# Altium PCB TabletDesign.PcbDoc (part 2 of 3)
Units mm, origin at the board's own origin, x right, y up, seen from the top; angles counter-clockwise.
Board outline 140 x 100 mm, 2 copper layers (Top Layer, Bottom Layer); 256 components, 248 nets, 1066 pads, 0 vias.
Unrouted connection lines stored in the file: 625.
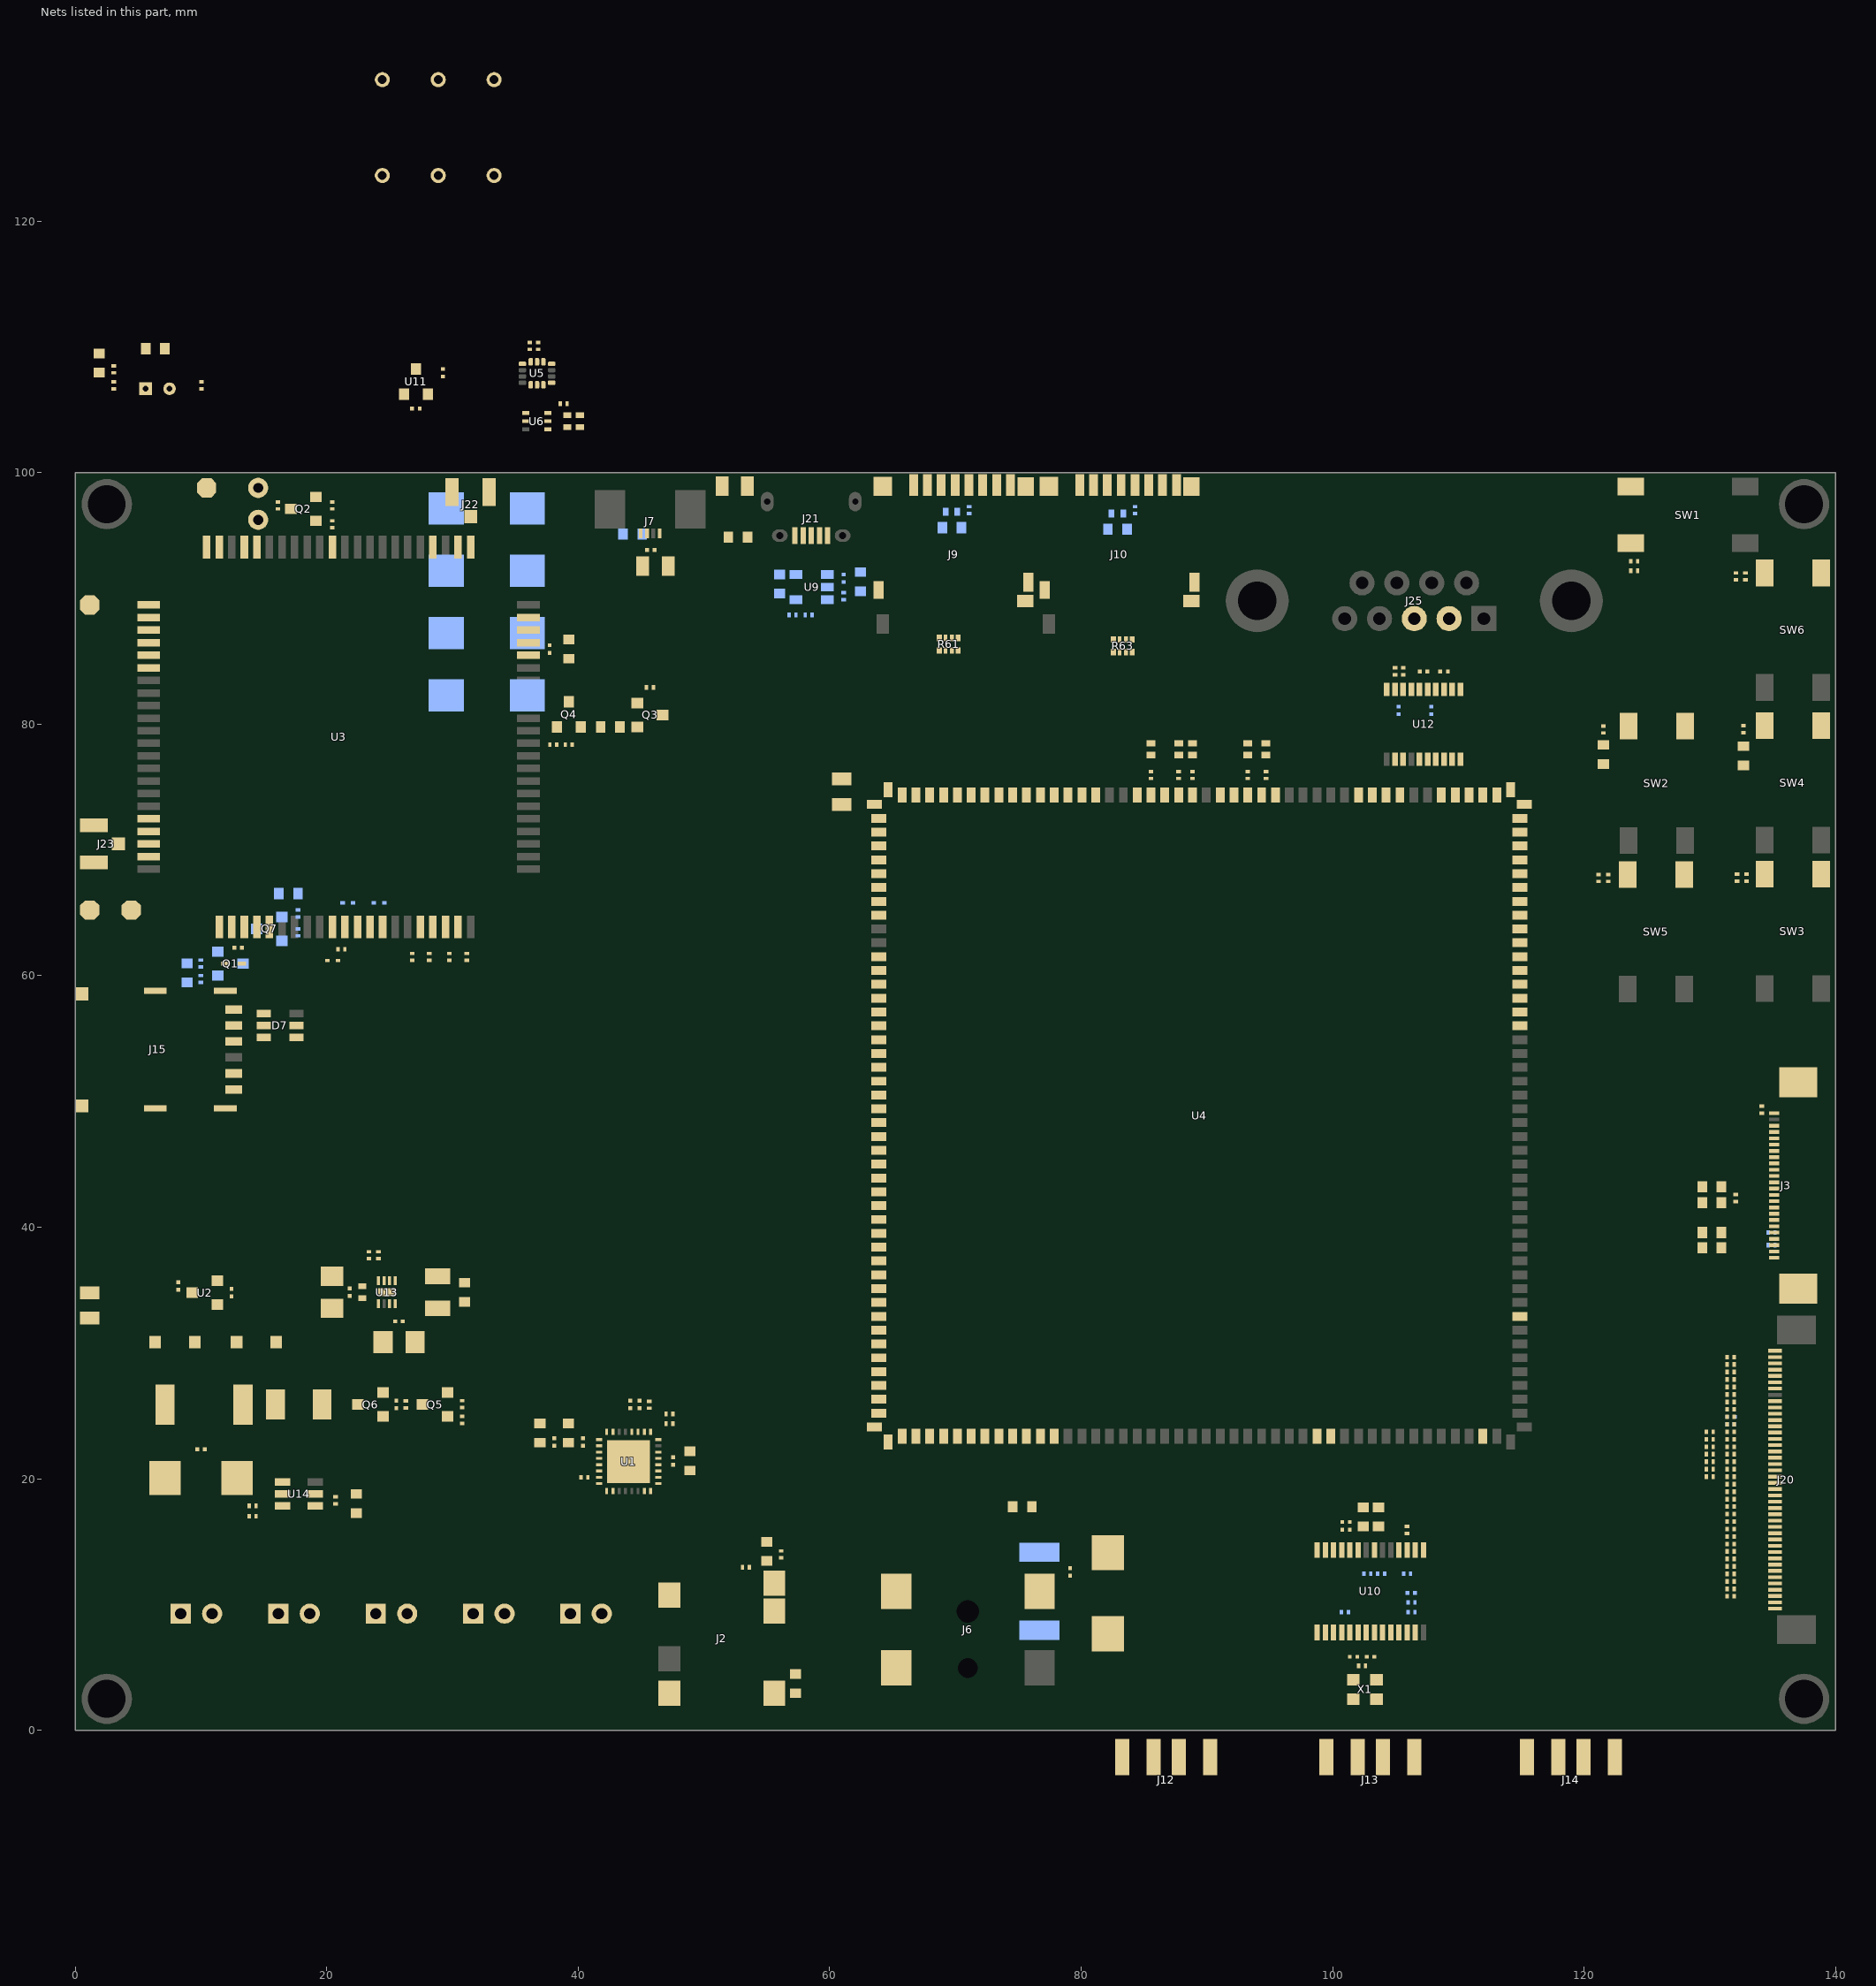
[diagram p2: the nets of this part, all layers, seen from the top]

## Part data (continued)
C38 C39 C54 C56: library part GCM1555C1H101JA16D, "CAP CER 100PF 50V C0G/NP0 0402", Case Code (Imperial)=0402, Case Code (Metric)=1005, Dielectric=C0G, Manufacturer=Murata, Max Operating Temperature=125°C, Min Operating Temperature=-55°C, Package Quantity=10000, Ratings=AEC-Q200, Supplier Part Number 1=490-10669-1-ND, Tolerance=5%, Voltage=50V, Capacitance=100pF, Case/Package=0402, ComponentLink1Description=https://www.verical.com/server-webapp/html/getDatasheet?partID=748988&src-supplier=Verical, ComponentLink1URL=https://www.verical.com/server-webapp/html/getDatasheet?partID=748988&src-supplier=Verical, Depth=0.5mm, Height=0.5mm, Lead Free="Lead Free", Length=1mm, Manufacturer Part Number=GCM1555C1H101JA16D, Mount="Surface Mount", Packaging="Tape and Reel", Pricing 1="1=0.1, 10=0.068, 100=0.0303, 500=0.02166, 1000=0.01701, 2500=0.01547, 5000=0.01423 (USD)", Radiation Hardening=No, REACH SVHC="No SVHC", Stock 1=2688959, Supplier 1=Digi-Key, Termination=SMD/SMT, Thickness=0.022inch, Voltage Rating=50V, Voltage Rating (DC)=50V, Weight=0.000212oz, Width=0.02inch
C65 C66: library part GCM0335C1H180FA16D, "CAP CER 18PF 50V C0G/NP0 0201", Manufacturer=Murata, Supplier Part Number 1=490-GCM0335C1H180FA16DCT-ND, Category="Ceramic Capacitors", Manufacturer Part Number=GCM0335C1H180FA16D, Pricing 1="1=0.10000, 10=0.06500, 50=0.03560, 100=0.02910, 500=0.02076, 1000=0.01630, 2500=0.01482, 5000=0.01364 (USD)", RoHS=Yes, RoHS Compliant=Yes, Stock 1=7977, Supplier 1=Digi-Key
C83: library part GRM0335C1H100FA01D, "CAP CER 10PF 50V C0G/NP0 0201", Case Code (Imperial)=0201, Case Code (Metric)=0603, Dielectric=C0G, Manufacturer=Murata, Max Operating Temperature=125°C, Min Operating Temperature=-55°C, Package Quantity=15000, Supplier Part Number 1=490-7750-1-ND, Tolerance=1%, Voltage Rating=50V, Capacitance=10pF, Case/Package=0201, Category="Ceramic Capacitors", ComponentLink1Description=http://www.mouser.com/ds/2/281/c02e-2905.pdf?src-supplier=Mouser, ComponentLink1URL=http://www.mouser.com/ds/2/281/c02e-2905.pdf?src-supplier=Mouser, ComponentLink2Description=http://search.murata.co.jp/Ceramy/image/img/A01X/G101/ENG/GRM0335C1H100FA01-01.pdf?src-supplier=Digi-Key, ComponentLink2URL=http://search.murata.co.jp/Ceramy/image/img/A01X/G101/ENG/GRM0335C1H100FA01-01.pdf?src-supplier=Digi-Key, Height=0.3mm, Lead Free="Lead Free", Length=0.024inch, Manufacturer Part Number=GRM0335C1H100FA01D, Mount="Surface Mount", Packaging="Tape and Reel", Pricing 1="1=0.10000, 10=0.01900, 50=0.01060, 100=0.00860, 500=0.00616, 1000=0.00484, 2500=0.00440, 5000=0.00405 (USD)", RoHS=Yes, Stock 1=317364, Supplier 1=Digi-Key, Termination=SMD/SMT, Thickness=0.013inch, Voltage Rating (DC)=50V, Width=0.012inch
C84 C87: library part EMK316BBJ476ML-T, "CAP CER 47UF 16V X5R 1206", Case Code (Imperial)=1206, Case Code (Metric)=3216, Manufacturer="Taiyo Yuden", Max Operating Temperature=85°C, Min Operating Temperature=-55°C, Supplier Part Number 1=587-5425-1-ND, Tolerance=20%, Voltage Rating=16V, Capacitance=47uF, Case/Package=1206, ComponentLink1Description=http://ds.yuden.co.jp/TYCOMPAS/ut/detail.do?productNo=EMK316BBJ476ML-T&fileName=EMK316BBJ476ML-T_SS&mode=specSheetDownload&src-supplier=Digi-Key, ComponentLink1URL=http://ds.yuden.co.jp/TYCOMPAS/ut/detail.do?productNo=EMK316BBJ476ML-T&fileName=EMK316BBJ476ML-T_SS&mode=specSheetDownload&src-supplier=Digi-Key, ComponentLink2Description=http://www.farnell.com/datasheets/2819853.pdf?src-supplier=Element14, ComponentLink2URL=http://www.farnell.com/datasheets/2819853.pdf?src-supplier=Element14, ComponentLink3Description=http://www.farnell.com/datasheets/2819853.pdf?src-supplier=Farnell, ComponentLink3URL=http://www.farnell.com/datasheets/2819853.pdf?src-supplier=Farnell, ComponentLink4Description=http://www.farnell.com/datasheets/2819853.pdf?src-supplier=Newark, ComponentLink4URL=http://www.farnell.com/datasheets/2819853.pdf?src-supplier=Newark, Manufacturer Part Number=EMK316BBJ476ML-T, Mount="Surface Mount", Packaging="Tape and Reel", Pricing 1="1=0.81, 10=0.595, 100=0.408, 500=0.32304, 1000=0.27203 (USD)", Stock 1=25339, Supplier 1=Digi-Key
C86: library part CC0402JRNPO9BN220, "CAP CER 22PF 50V C0G/NPO 0402", Case Code (Imperial)=0402, Case Code (Metric)=1005, Dielectric=C0G, Dielectric Material=Ceramic, Insulation Resistance=100GR, Manufacturer=Yageo, Max Operating Temperature=125°C, Min Operating Temperature=-55°C, Package Quantity=1, Supplier Part Number 1=311-1018-1-ND, Temperature Coefficient=30ppm/°C, Tolerance=5%, Voltage=50V, Capacitance=22pF, Case/Package=0402, ComponentLink1Description=http://www.yageo.com/documents/recent/UPY-GP_NP0_16V-to-50V_16.pdf?src-supplier=Digi-Key, ComponentLink1URL=http://www.yageo.com/documents/recent/UPY-GP_NP0_16V-to-50V_16.pdf?src-supplier=Digi-Key, ComponentLink2Description=http://www.farnell.com/datasheets/1443161.pdf?src-supplier=Farnell, ComponentLink2URL=http://www.farnell.com/datasheets/1443161.pdf?src-supplier=Farnell, ComponentLink3Description=http://www.farnell.com/datasheets/1443161.pdf?src-supplier=Element14, ComponentLink3URL=http://www.farnell.com/datasheets/1443161.pdf?src-supplier=Element14, ComponentLink4Description=http://www.yageo.com/documents/recent/UPY-GP_NP0_16V-to-50V_8.pdf?src-supplier=Avnet+Europe, ComponentLink4URL=http://www.yageo.com/documents/recent/UPY-GP_NP0_16V-to-50V_8.pdf?src-supplier=Avnet+Europe, ComponentLink5Description=http://www.farnell.com/datasheets/1132289.pdf?src-supplier=Element14, ComponentLink5URL=http://www.farnell.com/datasheets/1132289.pdf?src-supplier=Element14, ComponentLink6Description=http://www.mouser.com/ds/2/447/Yageo_UPY-GP_NP0_16V-to-50V_9-358835.pdf?src-supplier=Mouser, ComponentLink6URL=http://www.mouser.com/ds/2/447/Yageo_UPY-GP_NP0_16V-to-50V_9-358835.pdf?src-supplier=Mouser, ComponentLink7Description=https://www.verical.com/server-webapp/html/getDatasheet?partID=370074&src-supplier=Verical, ComponentLink7URL=https://www.verical.com/server-webapp/html/getDatasheet?partID=370074&src-supplier=Verical, Composition=Ceramic, Depth=0.5mm, Height=0.5mm, Lead Free="Lead Free", Length=1mm, Manufacturer Part Number=CC0402JRNPO9BN220, Mount="Surface Mount", Number of Pins=2, Packaging="Tape and Reel", Pricing 1="1=0.1, 10=0.029, 100=0.0128, 500=0.00912, 1000=0.00716, 2500=0.00651, 5000=0.00599 (USD)", Radiation Hardening=No, REACH SVHC="No SVHC", Stock 1=518474, Supplier 1=Digi-Key, Termination=SMD/SMT, Thickness=0.022inch, Voltage Rating=50V, Voltage Rating (DC)=50V, Width=0.02inch
C90: library part T491C226K025AT, "CAP TANT 22UF 10% 25V 2312", Case Code (Imperial)=2412, Case Code (Metric)=6032, Case/Package=Molded, Dielectric Material=Tantalum, ESR (Equivalent Series Resistance)=1.4R, Leakage Current=5.5uA, Manufacturer=KEMET, Max Operating Temperature=125°C, Min Operating Temperature=-55°C, Package Quantity=1, Ripple Current=280mA, Supplier Part Number 1=399-3746-1-ND, Tolerance=10%, Voltage=25V, Capacitance=22uF, ComponentLink1Description=https://search.kemet.com/component-edge/download/datasheet/T491C226K025AT.pdf?src-supplier=Digi-Key, ComponentLink1URL=https://search.kemet.com/component-edge/download/datasheet/T491C226K025AT.pdf?src-supplier=Digi-Key, ComponentLink2Description=http://www.jameco.com/Jameco/Products/ProdDS/1573951.pdf?src-supplier=Jameco, ComponentLink2URL=http://www.jameco.com/Jameco/Products/ProdDS/1573951.pdf?src-supplier=Jameco, ComponentLink3Description=https://www.alliedelec.com/m/d/1172a60f7bb3eb66344f86e8fb9ddbde.pdf?src-supplier=Allied+Electronics, ComponentLink3URL=https://www.alliedelec.com/m/d/1172a60f7bb3eb66344f86e8fb9ddbde.pdf?src-supplier=Allied+Electronics, ComponentLink4Description=http://www.farnell.com/datasheets/1698764.pdf?src-supplier=Element14, ComponentLink4URL=http://www.farnell.com/datasheets/1698764.pdf?src-supplier=Element14, ComponentLink5Description=https://api.kemet.com/component-edge/download/datasheet/T491C226K025AT.pdf?src-supplier=Digi-Key, ComponentLink5URL=https://api.kemet.com/component-edge/download/datasheet/T491C226K025AT.pdf?src-supplier=Digi-Key, ComponentLink6Description=http://www.farnell.com/datasheets/1923792.pdf?src-supplier=Element14, ComponentLink6URL=http://www.farnell.com/datasheets/1923792.pdf?src-supplier=Element14, ComponentLink7Description=https://www.distrelec.biz/Web/Downloads/_t/ds/KEM_T2005_T491_eng_tds.pdf?mime=application%2Fpdf&src-supplier=Distrelec, ComponentLink7URL=https://www.distrelec.biz/Web/Downloads/_t/ds/KEM_T2005_T491_eng_tds.pdf?mime=application%2Fpdf&src-supplier=Distrelec, Depth=3.2mm, Dissipation Factor=6%, Features="General Purpose", Height=2.5mm, Height - Seated (Max)=0.11inch, Lead Free="Lead Free", Lead Pitch=2.9mm, Length=6mm, Life (Hours)=2000Hour, Manufacturer Part Number=T491C226K025AT, Mount="Surface Mount,PCB", Number of Pins=2, Packaging="Tape and Reel", Polarity=Polar, Pricing 1="1=0.82, 10=0.626, 100=0.4479 (USD)", Radiation Hardening=No, REACH SVHC="No SVHC", Stock 1=17993, Supplier 1=Digi-Key, Termination=SMD/SMT, Voltage Rating=25V, Voltage Rating (DC)=25V, Width=0.126inch
D1 D2: "DIODE GEN PURP 100V 300MA SOD123", Average Rectified Current=300mA, Capacitance=2pF, Current Rating=150mA, Forward Voltage=1.25V, Manufacturer=Diodes, Max Forward Surge Current (Ifsm)=2A, Max Operating Temperature=150°C, Max Repetitive Reverse Voltage (Vrrm)=100V, Min Operating Temperature=-65°C, Package Quantity=3000, Peak Reverse Current=1uA, Power Dissipation=400mW, Supplier Part Number 1=1N4148W-FDICT-ND, Voltage Rating (DC)=75V, ComponentLink1Description=https://www.diodes.com/assets/Datasheets/ds30086.pdf?src-supplier=Digi-Key, ComponentLink1URL=https://www.diodes.com/assets/Datasheets/ds30086.pdf?src-supplier=Digi-Key, ComponentLink2Description=http://www.farnell.com/datasheets/2238378.pdf?src-supplier=Element14, ComponentLink2URL=http://www.farnell.com/datasheets/2238378.pdf?src-supplier=Element14, ComponentLink3Description=http://www.mouser.com/ds/2/115/ds30086-60872.pdf?src-supplier=Mouser, ComponentLink3URL=http://www.mouser.com/ds/2/115/ds30086-60872.pdf?src-supplier=Mouser, ComponentLink4Description=https://www.diodes.com/assets/Datasheets/ds30086.pdf?src-supplier=Avnet, ComponentLink4URL=https://www.diodes.com/assets/Datasheets/ds30086.pdf?src-supplier=Avnet, ComponentLink5Description=https://www.diodes.com/assets/Datasheets/ds30086.pdf?src-supplier=Avnet+Europe, ComponentLink5URL=https://www.diodes.com/assets/Datasheets/ds30086.pdf?src-supplier=Avnet+Europe, ComponentLink6Description=https://www.diodes.com/assets/Datasheets/ds30086.pdf?src-supplier=Verical, ComponentLink6URL=https://www.diodes.com/assets/Datasheets/ds30086.pdf?src-supplier=Verical, Contact Plating=Tin,Matte, Element Configuration=Single, Forward Current=150mA, Height=1.25mm, Lead Free="Lead Free", Length=2.85mm, Manufacturer Part Number=1N4148W-7-F, Max Reverse Voltage (DC)=100V, Max Surge Current=2A, Mount="Surface Mount", Number of Pins=2, Output Current=150mA, Packaging="Tape and Reel", Peak Non-Repetitive Surge Current=2A, Polarity=Standard, Power Rating=400mW, Pricing 1="1=0.16, 10=0.146, 25=0.1388, 100=0.0611, 250=0.05868, 500=0.048, 1000=0.03333 (USD)", Radiation Hardening=No, REACH SVHC="No SVHC", Recovery Time=4ns, Reverse Recovery Time=4ns, Stock 1=3949286, Supplier 1=Digi-Key, Voltage=100V, Weight=0.000353oz, Width=1.7mm
D3: "TVS DIODE 15V 34V SOD523", Breakdown Voltage=18V, Capacitance=105pF, Clamping Voltage=34V, Clamping Voltage-Max=24V, Leakage Current=500nA, Manufacturer=STMicroelectronics, Max Operating Temperature=150°C, Max Power Dissipation=450W, Min Operating Temperature=-40°C, Package Quantity=1, Peak Pulse Current=12A, Peak Pulse Power=400W, Power Line Protection=No, Resistor Type=Zener, Reverse Standoff Voltage=15V, Supplier Part Number 1=497-10767-1-ND, Category="TVS Diodes", ComponentLink1Description=https://datasheet.ciiva.com/25958/cd00283838-25958148.pdf?src-supplier=Avnet+Europe, ComponentLink1URL=https://datasheet.ciiva.com/25958/cd00283838-25958148.pdf?src-supplier=Avnet+Europe, ComponentLink2Description=https://datasheet.ciiva.com/1276/1303462-1276854.pdf?src-supplier=Element14, ComponentLink2URL=https://datasheet.ciiva.com/1276/1303462-1276854.pdf?src-supplier=Element14, ComponentLink3Description=https://datasheet.ciiva.com/4479/cd00283838-118092-4479548.pdf?src-supplier=Mouser, ComponentLink3URL=https://datasheet.ciiva.com/4479/cd00283838-118092-4479548.pdf?src-supplier=Mouser, ComponentLink4Description=https://datasheet.ciiva.com/5782/cd00283838-5782837.pdf?src-supplier=Farnell, ComponentLink4URL=https://datasheet.ciiva.com/5782/cd00283838-5782837.pdf?src-supplier=Farnell, ComponentLink5Description=https://datasheet.ciiva.com/337/cd00283838-337816.pdf?src-supplier=Digi-Key, ComponentLink5URL=https://datasheet.ciiva.com/337/cd00283838-337816.pdf?src-supplier=Digi-Key, ComponentLink6Description=https://datasheet.ciiva.com/16437/cd00283838-16437848.pdf?src-supplier=Future+Electronics, ComponentLink6URL=https://datasheet.ciiva.com/16437/cd00283838-16437848.pdf?src-supplier=Future+Electronics, ComponentLink7Description=https://datasheet.ciiva.com/337/cd00283838-337817.pdf?src-supplier=Digi-Key, ComponentLink7URL=https://datasheet.ciiva.com/337/cd00283838-337817.pdf?src-supplier=Digi-Key, ComponentLink8Description=https://datasheet.ciiva.com/337/cd00283838-337818.pdf?src-supplier=Digi-Key, ComponentLink8URL=https://datasheet.ciiva.com/337/cd00283838-337818.pdf?src-supplier=Digi-Key, ComponentLink9Description=https://datasheet.ciiva.com/11195/cd00283838-11195357.pdf?src-supplier=Avnet, ComponentLink9URL=https://datasheet.ciiva.com/11195/cd00283838-11195357.pdf?src-supplier=Avnet, ComponentLink10Description=https://datasheet.ciiva.com/15193/getdatasheetpartid-249500-15193085.pdf?src-supplier=Verical, ComponentLink10URL=https://datasheet.ciiva.com/15193/getdatasheetpartid-249500-15193085.pdf?src-supplier=Verical, Contact Plating=Tin,Matte, Depth=0.8mm, Diode Type=ZENER, Direction=Unidirectional, Element Configuration=Single, ESD Protection=Yes, Height=0.5mm, Lead Free="Lead Free", Length=1.2mm, Manufacturer Part Number=ESDA18-1K, Max Breakdown Voltage=18V, Max Reverse Leakage Current=500nA, Min Breakdown Voltage=18V, Mount="Surface Mount", Number of Channels=1, Number of Pins=2, Number of Unidirectional Channels=1, Packaging="Tape and Reel", Polarity=Unidirectional, Pricing 1="1=0.41000, 10=0.28900, 100=0.14570, 500=0.12912, 1000=0.10049 (USD)", Radiation Hardening=No, REACH SVHC="No SVHC", RoHS=Yes, RoHS Compliant=Yes, Series="ESDA, TRANSIL™", Stock 1=43962, Supplier 1=Digi-Key, Termination=SMD/SMT, Width=0.9mm, Working Voltage=15V
D4: "Typical RED GaAs LED", LatestRevisionDate=08-Jul-2005, LatestRevisionNote="Mech Layer 1 removed.", PackageDescription="LED; 2 Leads", PackageReference=LED-1, Published=8-Jun-2000, Publisher="Altium Limited"
D6 D12: "DIODE SCHOTTKY 40V 3A DO214AB", Average Rectified Current=3A, Case/Package=SMC, Forward Voltage=500mV, Manufacturer="Vishay Semiconductors", Max Forward Surge Current (Ifsm)=100A, Max Operating Temperature=125°C, Max Repetitive Reverse Voltage (Vrrm)=40V, Max Reverse Current=500uA, Min Operating Temperature=-55°C, Package Quantity=1, Category="Rectifier Diodes", Contact Plating=Tin,Matte, Current=3A, Current Rating=3A, Element Configuration=Single, Forward Current=3A, Height=2.417mm, Lead Free="Lead Free", Length=7.11mm, Manufacturer Part Number=SS34-E3/57T, Max Reverse Leakage Current=500uA, Max Reverse Voltage (DC)=40V, Max Surge Current=100A, Mount="Surface Mount", Number of Pins=2, Output Current=3A, Packaging="Tape and Reel", Peak Non-Repetitive Surge Current=100A, Polarity=Standard, Pricing 1="850=0.23754, 1700=0.19495, 3400=0.19341, 5100=0.19188, 6800=0.19034, 8500=0.18881, 85000=0.18727 (USD)", Radiation Hardening=No, REACH SVHC=Unknown, RoHS=Yes, Stock 1=850, Supplier 1=Avnet, Supplier Part Number 1=SS34-E3/57T, Voltage=40V, Voltage Rating (DC)=40V, Width=6.22mm
D7: "TVS DIODE 3V SOT23-6", Breakdown Voltage=6.1V, Capacitance=50pF, Case/Package=SOT-23, Clamping Voltage=11.35V, Leakage Current=1uA, Manufacturer=STMicroelectronics, Max Breakdown Voltage=7.2V, Max Operating Temperature=125°C, Max Power Dissipation=100W, Min Operating Temperature=-40°C, Operating Supply Voltage=3V, Package Quantity=1, Peak Pulse Current=15A, Power Line Protection=No, Resistor Type=Zener, Supplier Part Number 1=497-7747-1-ND, Test Current=1mA, Category="TVS Diodes", ComponentLink1Description=https://datasheet.ciiva.com/5782/453742-5782854.pdf?src-supplier=Farnell, ComponentLink1URL=https://datasheet.ciiva.com/5782/453742-5782854.pdf?src-supplier=Farnell, ComponentLink2Description=https://datasheet.ciiva.com/15143/getdatasheetpartid-146092-15143750.pdf?src-supplier=Verical, ComponentLink2URL=https://datasheet.ciiva.com/15143/getdatasheetpartid-146092-15143750.pdf?src-supplier=Verical, ComponentLink3Description=https://datasheet.ciiva.com/16210/cd00005102-16210854.pdf?src-supplier=Future+Electronics, ComponentLink3URL=https://datasheet.ciiva.com/16210/cd00005102-16210854.pdf?src-supplier=Future+Electronics, ComponentLink4Description=https://datasheet.ciiva.com/14161/esda6v1l-st-eng-tds-14161530.pdf?src-supplier=Distrelec, ComponentLink4URL=https://datasheet.ciiva.com/14161/esda6v1l-st-eng-tds-14161530.pdf?src-supplier=Distrelec, ComponentLink5Description=https://datasheet.ciiva.com/4507/cd00005102-58005-4507934.pdf?src-supplier=Mouser, ComponentLink5URL=https://datasheet.ciiva.com/4507/cd00005102-58005-4507934.pdf?src-supplier=Mouser, ComponentLink6Description=https://datasheet.ciiva.com/338/cd00005102-338720.pdf?src-supplier=Digi-Key, ComponentLink6URL=https://datasheet.ciiva.com/338/cd00005102-338720.pdf?src-supplier=Digi-Key, ComponentLink7Description=https://datasheet.ciiva.com/22695/453742-22695670.pdf?src-supplier=Element14, ComponentLink7URL=https://datasheet.ciiva.com/22695/453742-22695670.pdf?src-supplier=Element14, ComponentLink8Description=https://datasheet.ciiva.com/7662/453742-7662123.pdf?src-supplier=Element14, ComponentLink8URL=https://datasheet.ciiva.com/7662/453742-7662123.pdf?src-supplier=Element14, ComponentLink9Description=https://datasheet.ciiva.com/1276/453742-1276863.pdf?src-supplier=Element14, ComponentLink9URL=https://datasheet.ciiva.com/1276/453742-1276863.pdf?src-supplier=Element14, ComponentLink10Description=https://datasheet.ciiva.com/41443/001184254-da-01-en-transil-array-esda6v1-5sc6-sot-23-6-stm-41443467.pdf?src-supplier=Conrad, ComponentLink10URL=https://datasheet.ciiva.com/41443/001184254-da-01-en-transil-array-esda6v1-5sc6-sot-23-6-stm-41443467.pdf?src-supplier=Conrad, Depth=1.75mm, Diode Type=ZENER, Direction=Unidirectional, Element Configuration="Common Anode", ESD Protection=Yes, Height=1.3mm, Lead Free="Lead Free", Length=3.05mm, Manufacturer Part Number=ESDA6V1-5SC6, Max Reverse Leakage Current=1uA, Min Breakdown Voltage=6.1V, Mount="Surface Mount", Number of Channels=5, Number of Elements=5, Number of Pins=6, Number of Unidirectional Channels=5, Packaging="Tape and Reel", Peak Pulse Power=100W, Polarity=Unidirectional, Pricing 1="1=0.46000, 10=0.39400, 100=0.27370, 500=0.21368, 1000=0.17378 (USD)", Radiation Hardening=No, REACH SVHC="No SVHC", Reverse Breakdown Voltage=6.1V, Reverse Standoff Voltage=3V, RoHS=Yes, RoHS Compliant=Yes, Series="ESDA, TRANSIL™", Stock 1=10768, Supplier 1=Digi-Key, Termination=SMD/SMT, Voltage Rating (DC)=6.1V, Width=1.75mm, Working Voltage=3V
D9 D10 D11: "TVS DIODE 5V 9.8V SOD923", Breakdown Voltage=5.4V, Capacitance=0.9pF, Case/Package=SOD-923-2, Clamping Voltage=9.8V, Leakage Current=1uA, Manufacturer="ON Semiconductor", Max Operating Temperature=150°C, Max Surge Current=1A, Min Operating Temperature=-55°C, Operating Supply Voltage=5V, Package Quantity=1, Peak Pulse Power=150mW, Power Line Protection=No, Resistor Type=Zener, Reverse Breakdown Voltage=5.8V, Supplier Part Number 1=ESD9L5.0ST5GOSCT-ND, Test Current=1mA, Category="ESD and Circuit Protection ICs", Clamping Voltage-Max=9.8V, ComponentLink1Description=https://datasheet.ciiva.com/15143/getdatasheetpartid-185186-15143896.pdf?src-supplier=Verical, ComponentLink1URL=https://datasheet.ciiva.com/15143/getdatasheetpartid-185186-15143896.pdf?src-supplier=Verical, ComponentLink2Description=https://datasheet.ciiva.com/4510/esd9l-d-4510647.pdf?src-supplier=Mouser, ComponentLink2URL=https://datasheet.ciiva.com/4510/esd9l-d-4510647.pdf?src-supplier=Mouser, ComponentLink3Description=https://datasheet.ciiva.com/3304/esd9l-d-3304011.pdf?src-supplier=Avnet, ComponentLink3URL=https://datasheet.ciiva.com/3304/esd9l-d-3304011.pdf?src-supplier=Avnet, ComponentLink4Description=https://datasheet.ciiva.com/16437/esd9l-d-16437835.pdf?src-supplier=Future+Electronics, ComponentLink4URL=https://datasheet.ciiva.com/16437/esd9l-d-16437835.pdf?src-supplier=Future+Electronics, ComponentLink5Description=https://datasheet.ciiva.com/339/esd9l-d-339853.pdf?src-supplier=Digi-Key, ComponentLink5URL=https://datasheet.ciiva.com/339/esd9l-d-339853.pdf?src-supplier=Digi-Key, ComponentLink6Description=https://datasheet.ciiva.com/339/esd9l-d-339854.pdf?src-supplier=Digi-Key, ComponentLink6URL=https://datasheet.ciiva.com/339/esd9l-d-339854.pdf?src-supplier=Digi-Key, ComponentLink7Description=https://datasheet.ciiva.com/11195/esd9l-d-11195342.pdf?src-supplier=Avnet, ComponentLink7URL=https://datasheet.ciiva.com/11195/esd9l-d-11195342.pdf?src-supplier=Avnet, ComponentLink8Description=https://datasheet.ciiva.com/25958/esd9l-d-25958446.pdf?src-supplier=Avnet+Europe, ComponentLink8URL=https://datasheet.ciiva.com/25958/esd9l-d-25958446.pdf?src-supplier=Avnet+Europe, ComponentLink9Description=https://datasheet.ciiva.com/339/esd9l-d-339855.pdf?src-supplier=Digi-Key, ComponentLink9URL=https://datasheet.ciiva.com/339/esd9l-d-339855.pdf?src-supplier=Digi-Key, Contact Plating=Tin,Matte, Depth=0.6mm, Diode Type=ZENER, Direction=Unidirectional, Element Configuration=Single, ESD Protection=Yes, Halogen Free="Halogen Free", Height=0.4mm, Lead Free="Lead Free", Length=0.8mm, Manufacturer Part Number=ESD9L5.0ST5G, Max Breakdown Voltage=5.4V, Max Reverse Leakage Current=1uA, Min Breakdown Voltage=5.4V, Number of Channels=1, Number of Elements=1, Number of Lines=1, Number of Pins=2, Number of Unidirectional Channels=1, Packaging="Tape and Reel", Peak Pulse Current=1A, Polarity=Unidirectional, Power Dissipation=150mW, Pricing 1="1=0.37000, 10=0.25600, 100=0.12500, 500=0.10426, 1000=0.07244, 2000=0.06278 (USD)", Radiation Hardening=No, REACH SVHC="No SVHC", Reverse Standoff Voltage=5V, RoHS=Yes, RoHS Compliant=Yes, Series="Automotive, AEC-Q101", Stock 1=558996, Supplier 1=Digi-Key, Termination=SMD/SMT, Width=0.65mm, Working Voltage=5V
J1 J16 J17 J18 J19: "CONN HEADER R/A 2POS 2.5MM", Color=Natural, Contact Resistance=20mR, Current Rating=3A, Housing Color=White, Insulation Resistance=1GR, Manufacturer=JST, Max Operating Temperature=85°C, Max Voltage Rating (AC)=250V, Min Operating Temperature=-25°C, Package Quantity=1000, Supplier Part Number 1=455-2257-ND, Category="Headers and Wire Housings", ComponentLink1Description=https://datasheet.ciiva.com/16208/s2b-xh-alfsn-16208978.pdf?src-supplier=Future+Electronics, ComponentLink1URL=https://datasheet.ciiva.com/16208/s2b-xh-alfsn-16208978.pdf?src-supplier=Future+Electronics, ComponentLink2Description=https://datasheet.ciiva.com/8052/1684882-8052211.pdf?src-supplier=Element14, ComponentLink2URL=https://datasheet.ciiva.com/8052/1684882-8052211.pdf?src-supplier=Element14, ComponentLink3Description=https://datasheet.ciiva.com/11746/0900766b8082f560-11746947.pdf?src-supplier=RSComponents, ComponentLink3URL=https://datasheet.ciiva.com/11746/0900766b8082f560-11746947.pdf?src-supplier=RSComponents, ComponentLink4Description=https://datasheet.ciiva.com/26894/getdatasheetpartid-640270-26894603.pdf?src-supplier=Verical, ComponentLink4URL=https://datasheet.ciiva.com/26894/getdatasheetpartid-640270-26894603.pdf?src-supplier=Verical, ComponentLink5Description=https://datasheet.ciiva.com/26924/getdatasheetpartid-645395-26924076.pdf?src-supplier=Verical, ComponentLink5URL=https://datasheet.ciiva.com/26924/getdatasheetpartid-645395-26924076.pdf?src-supplier=Verical, ComponentLink6Description=https://datasheet.ciiva.com/26894/getdatasheetpartid-441330-26894909.pdf?src-supplier=Verical, ComponentLink6URL=https://datasheet.ciiva.com/26894/getdatasheetpartid-441330-26894909.pdf?src-supplier=Verical, ComponentLink7Description=https://datasheet.ciiva.com/726/exh-726412.pdf?src-supplier=Digi-Key, ComponentLink7URL=https://datasheet.ciiva.com/726/exh-726412.pdf?src-supplier=Digi-Key, ComponentLink8Description=https://datasheet.ciiva.com/20207/523653-20207183.pdf?src-supplier=Rapid+Electronics, ComponentLink8URL=https://datasheet.ciiva.com/20207/523653-20207183.pdf?src-supplier=Rapid+Electronics, Connector Type="Male Pin", Contact Material=Brass, Contact Plating=Tin,Copper,Lead, Depth=11.5mm, Gender=Male, Housing Material=Polyamide, Lead Free="Lead Free", Lead Pitch=2.5mm, Length=7.4mm, Manufacturer Part Number=S2B-XH-A(LF)(SN), Max Current Rating=3A, Max Voltage Rating (DC)=250V, Mount="Through Hole", Number of Contacts=2, Number of Positions=2, Number of Rows=1, Orientation="Right Angle", Packaging=Bulk, Pitch=2.5mm, Pricing 1="1=0.17000, 10=0.16200, 100=0.11260, 500=0.09524, 1000=0.07792, 5000=0.06927, 10000=0.06277 (USD)", REACH SVHC="No SVHC", RoHS=Yes, Stock 1=44898, Supplier 1=Digi-Key, Termination=Press-Fit, Voltage Rating=250V, Voltage Rating (AC)=250V, Wire/Cable Gauge=22AWG
J2: library part SJ-43504-SMT, "CONN JACK 4COND 3.5MM SMD R/A", Body Color=Black, Case/Package=SMD/SMT, Current Rating=1A, Manufacturer=CUI, Supplier Part Number 1=CP-43504SJCT-ND, Body Material=Brass, Category=Connectors, Color=Black, ComponentLink1Description=http://www.cui.com/product/resource/digikeypdf/sj-43504-smt.pdf?src-supplier=Digi-Key, ComponentLink1URL=http://www.cui.com/product/resource/digikeypdf/sj-43504-smt.pdf?src-supplier=Digi-Key, ComponentLink2Description=https://www.cui.com/product/resource/digikeypdf/sj-43504-smt-tr.pdf?src-supplier=Digi-Key, ComponentLink2URL=https://www.cui.com/product/resource/digikeypdf/sj-43504-smt-tr.pdf?src-supplier=Digi-Key, Connector Type=Jack, Contact Plating=Gold, Gender=Female, Lead Free="Lead Free", Manufacturer Part Number=SJ-43504-SMT-TR, Mount="Surface Mount,Board", Number of Conductors=4, Number of Ports=1, Orientation=Horizontal, Packaging="Tape and Reel", Pricing 1="1=1.14000, 10=1.00500, 25=0.94560, 50=0.90620, 100=0.86680, 250=0.78800, 500=0.70920 (USD)", RoHS=Yes, RoHS Compliant=Yes, Series=-, Shielding=Shielded, Stock 1=13818, Supplier 1=Digi-Key, Termination=Solder
J3: "CONN FFC TOP 24POS 0.50MM R/A", Current Rating=500mA, Manufacturer=Molex, Manufacturer Part Number=52435-2471, Max Operating Temperature=85°C, Max Voltage Rating (AC)=50V, Max Voltage Rating (DC)=5.05kV, Min Operating Temperature=-40°C, Package Quantity=1000, Supplier Part Number 1=WM7975CT-ND, Category="FFC / FPC", ComponentLink1Description=https://datasheet.ciiva.com/1484/1629121-1484657.pdf?src-supplier=Newark, ComponentLink1URL=https://datasheet.ciiva.com/1484/1629121-1484657.pdf?src-supplier=Newark, ComponentLink2Description=https://datasheet.ciiva.com/5137/0524352471-ffc-fpc-connectors-170593-5137745.pdf?src-supplier=Mouser, ComponentLink2URL=https://datasheet.ciiva.com/5137/0524352471-ffc-fpc-connectors-170593-5137745.pdf?src-supplier=Mouser, ComponentLink3Description=https://datasheet.ciiva.com/30088/283130524352471-ffc-fpc-nectors-30088679.pdf?src-supplier=Onlinecomponents.com, ComponentLink3URL=https://datasheet.ciiva.com/30088/283130524352471-ffc-fpc-nectors-30088679.pdf?src-supplier=Onlinecomponents.com, ComponentLink4Description=https://datasheet.ciiva.com/3925/128320524352471-ffc-fpc-nectors-3925353.pdf?src-supplier=Arrow+Electronics, ComponentLink4URL=https://datasheet.ciiva.com/3925/128320524352471-ffc-fpc-nectors-3925353.pdf?src-supplier=Arrow+Electronics, ComponentLink5Description=https://datasheet.ciiva.com/16659/0524352471-ffc-fpc-connectors-16659957.pdf?src-supplier=Avnet+Europe, ComponentLink5URL=https://datasheet.ciiva.com/16659/0524352471-ffc-fpc-connectors-16659957.pdf?src-supplier=Avnet+Europe, ComponentLink6Description=https://datasheet.ciiva.com/8038/1597798-8038390.pdf?src-supplier=Element14, ComponentLink6URL=https://datasheet.ciiva.com/8038/1597798-8038390.pdf?src-supplier=Element14, ComponentLink7Description=https://datasheet.ciiva.com/10364/0524352471-ffc-fpc-connectors-10364236.pdf?src-supplier=Avnet, ComponentLink7URL=https://datasheet.ciiva.com/10364/0524352471-ffc-fpc-connectors-10364236.pdf?src-supplier=Avnet, Contact Location=Top, Contact Material=Bronze, Contact Plating=Gold, Depth=4.7mm, Gender=Receptacle, Housing Material=Nylon, Length=18.6mm, Number of Circuits=24, Number of Contacts=24, Number of Positions=24, Number of Rows=1, Orientation="Right Angle", Packaging="Tape and Reel", Pitch=0.5mm, Pricing 1="1=2.22000, 10=1.89200, 100=1.56290 (USD)", Radiation Hardening=No, REACH SVHC=Unknown, RoHS=Yes, Stackable=No, Stock 1=1377, Supplier 1=Digi-Key, Termination=Solder, Voltage Rating=50V
J6: "DC Power Receptacle Jack 2.5A 2.5mm 6.5mm SMD Power Connectors RoHS", Manufacturer="XKB Enterprise", Package=Custom, Manufacturer Part No=DC-005-5A-2.5-SMT
J7: "CONN FFC BOTTOM 4POS 0.50MM R/A", Actuator Color=Brown, Contact Resistance=20mR, Current Rating=500mA, Flammability Rating="UL94 V-0", Housing Color=Natural, Manufacturer=Molex, Manufacturer Part Number=52746-0471, Max Operating Temperature=85°C, Min Operating Temperature=-20°C, Package Quantity=1, Supplier Part Number 1=WM6768CT-ND, Voltage Rating=50V, Actuator Material=Glass,Polyphenylene, Category="FFC / FPC", ComponentLink1Description=https://datasheet.ciiva.com/8038/1597791-8038563.pdf?src-supplier=Element14, ComponentLink1URL=https://datasheet.ciiva.com/8038/1597791-8038563.pdf?src-supplier=Element14, ComponentLink2Description=https://datasheet.ciiva.com/11745/0900766b80dfdcc6-11745365.pdf?src-supplier=RSComponents, ComponentLink2URL=https://datasheet.ciiva.com/11745/0900766b80dfdcc6-11745365.pdf?src-supplier=RSComponents, ComponentLink3Description=https://datasheet.ciiva.com/15176/getdatasheetpartid-367391-15176714.pdf?src-supplier=Verical, ComponentLink3URL=https://datasheet.ciiva.com/15176/getdatasheetpartid-367391-15176714.pdf?src-supplier=Verical, Contact Location=Bottom, Contact Material=Bronze, Contact Plating=Gold, Depth=4.3mm, Gender=Receptacle, Housing Material=Nylon, Length=8.1mm, Mating Cycles=20, Mount="Surface Mount", Number of Contacts=4, Number of Positions=4, Number of Rows=1, Orientation="Right Angle", Packaging="Tape and Reel", Pitch=0.5mm, Pricing 1="1=0.76000, 10=0.64000, 100=0.49810 (USD)", Radiation Hardening=No, REACH SVHC=Unknown, RoHS=Yes, RoHS Compliant=Yes, Series="Easy-On™ 52746", Stock 1=213, Supplier 1=Digi-Key, Termination=Solder, Wire/Cable Type=Straight
J8 J26: library part "SMD PAD"
J9 J10: "CONN MICRO SD CARD PUSH-PULL R/A", Manufacturer="AMPHENOL ICC (COMMERCIAL PRODUCTS)", Supplier Part Number 1=114-00841-68-6-ND, Connector Type=Connector, Contact Plating=Gold, Manufacturer Part Number=114-00841-68, Mount="Surface Mount", Packaging="Tape and Reel", Pricing 1="1=1.32, 10=1.194, 25=1.1208, 50=1.0722, 100=1.0235, 250=0.926, 500=0.8529 (USD)", Stock 1=29968, Supplier 1=Digi-Key
J12 J13 J14: "USB Connectors 4P RECEPTACLE TYPE A", Color=White, Contact Resistance=30mR, Current Rating=1A, Flammability Rating="UL94 V-0", Insulation Resistance=1GR, Manufacturer="Amphenol FCI", Max Operating Temperature=40°C, Min Operating Temperature=0°C, Package Quantity=42, Supplier Part Number 1=70236897, Body Plating=Nickel, Category=Connectors, ComponentLink1Description=https://datasheet.ciiva.com/851/87583-851211.pdf?src-supplier=Digi-Key, ComponentLink1URL=https://datasheet.ciiva.com/851/87583-851211.pdf?src-supplier=Digi-Key, ComponentLink2Description=https://datasheet.ciiva.com/1100/57319-1100818.pdf?src-supplier=Newark, ComponentLink2URL=https://datasheet.ciiva.com/1100/57319-1100818.pdf?src-supplier=Newark, ComponentLink3Description=https://datasheet.ciiva.com/25614/0900766b8118e6e2-25614557.pdf?src-supplier=RSComponents, ComponentLink3URL=https://datasheet.ciiva.com/25614/0900766b8118e6e2-25614557.pdf?src-supplier=RSComponents, ComponentLink4Description=https://datasheet.ciiva.com/4599/gs-12-095-532824-4599287.pdf?src-supplier=Mouser, ComponentLink4URL=https://datasheet.ciiva.com/4599/gs-12-095-532824-4599287.pdf?src-supplier=Mouser, ComponentLink5Description=https://datasheet.ciiva.com/15181/getdatasheetpartid-106468-15181159.pdf?src-supplier=Verical, ComponentLink5URL=https://datasheet.ciiva.com/15181/getdatasheetpartid-106468-15181159.pdf?src-supplier=Verical, ComponentLink6Description=https://datasheet.ciiva.com/3094/87583-3094440.pdf?src-supplier=Avnet, ComponentLink6URL=https://datasheet.ciiva.com/3094/87583-3094440.pdf?src-supplier=Avnet, ComponentLink7Description=https://datasheet.ciiva.com/14619/70236897-14619037.pdf?src-supplier=Allied+Electronics, ComponentLink7URL=https://datasheet.ciiva.com/14619/70236897-14619037.pdf?src-supplier=Allied+Electronics, Connector Type=USB,Receptacle, Contact Material="Copper Alloy", Contact Plating=GXT,Gold, Depth=14mm, Gender=Receptacle, Housing Material=Thermoplastic, Interface=USB, Length=14.5mm, Manufacturer Part Number=87583-2010BLF, Material=Tin, Mating Cycles=1500, Mount="Surface Mount,Horizontal", Number of Contacts=4, Number of Ports=1, Number of Positions=4, Number of Terminals/Pins=4, Orientation="Right Angle", Packaging=Rail/Tube, Plating=Nickel, Radiation Hardening=No, REACH SVHC="No SVHC", RoHS=Yes, RoHS Compliant=Yes, Series=87583, Supplier 1="Allied Electronics", Termination=Solder, USB Standard="USB 2.0"
J15: "CONN SMART CARD PUSH-PULL", Manufacturer="Wurth Electronics", Supplier Part Number 1=732-5954-1-ND, Connector Type=Connector, Contact Material="Copper Alloy", Contact Plating=Gold, Features=Shielded, Lead Free="Lead Free", Manufacturer Part Number=693043020611, Mount="Surface Mount", Number of Contacts=6, Number of Pins=6, Number of Positions=6, Packaging="Tape and Reel", Pricing 1="1=1.69, 10=1.663, 50=1.54, 100=1.417, 500=1.232 (USD)", REACH SVHC=Unknown, Stock 1=21915, Supplier 1=Digi-Key
J20: "CONN FPC BOTTOM 42POS 0.50MM R/A"
J21: "USB - Micro B Female USB 2 5 SMD USB Connectors RoHS", Color=Black, Current Rating=1.8A, Flammability Rating="UL94 V-0", Insulation Resistance=1GR, Manufacturer="Amphenol FCI", Max Operating Temperature=85°C, Max Voltage Rating (AC)=100V, Min Operating Temperature=-55°C, Package Quantity=9600, Supplier Part Number 1=609-4618-1-ND, ComponentLink1Description=http://www.amphenol-icc.com/media/wysiwyg/files/drawing/10118194.pdf?src-supplier=Digi-Key, ComponentLink1URL=http://www.amphenol-icc.com/media/wysiwyg/files/drawing/10118194.pdf?src-supplier=Digi-Key, ComponentLink2Description=https://cdn.amphenol-icc.com/media/wysiwyg/files/drawing/10118194.pdf?src-supplier=Mouser, ComponentLink2URL=https://cdn.amphenol-icc.com/media/wysiwyg/files/drawing/10118194.pdf?src-supplier=Mouser, ComponentLink3Description=https://cdn.amphenol-icc.com/media/wysiwyg/files/drawing/10118194.pdf?src-supplier=Verical, ComponentLink3URL=https://cdn.amphenol-icc.com/media/wysiwyg/files/drawing/10118194.pdf?src-supplier=Verical, Connector Type=USB,Receptacle, Contact Material="Copper Alloy", Contact Plating=Gold, Depth=5mm, Features=Shielded, Gender=Receptacle, Housing Material=Polymer, Lead Free="Lead Free", Length=8.05mm, Manufacturer Part Number=10118194-0001LF, Mount="Surface Mount,Horizontal", Number of Contacts=5, Number of Ports=1, Number of Terminals=5, Orientation="Right Angle", Packaging="Tape and Reel", Pitch=0.65mm, Pricing 1="1=0.43, 10=0.405, 25=0.3648, 50=0.3242, 100=0.3107, 250=0.28368, 500=0.27016 (USD)", Radiation Hardening=No, Stock 1=35943, Supplier 1=Digi-Key, Termination=Solder
J22 J23: "CONN U.FL RCPT STR 50 OHM SMD", Case/Package=SMD/SMT, Manufacturer=Hirose, Package Quantity=10000, Supplier Part Number 1=U.FL-R-SMT-1(80)-CUTT, ComponentLink1Description=https://www.hirose.com/product/en/download_file/key_name/U.FL-R-SMT-1%2880%29/category/Specification%20Sheet/doc_file_id/37638/?file_category_id=9&item_id=03310472280&is_series=&src-supplier=Digi-Key, ComponentLink1URL=https://www.hirose.com/product/en/download_file/key_name/U.FL-R-SMT-1%2880%29/category/Specification%20Sheet/doc_file_id/37638/?file_category_id=9&item_id=03310472280&is_series=&src-supplier=Digi-Key, ComponentLink2Description=http://www.mouser.com/ds/2/185/U.FL_catalog-939761.pdf?src-supplier=Mouser, ComponentLink2URL=http://www.mouser.com/ds/2/185/U.FL_catalog-939761.pdf?src-supplier=Mouser, Lead Free="Lead Free", Manufacturer Part Number=U.FL-R-SMT-1(80), Packaging="Tape and Reel", Pricing 1="1=1.07, 500=0.785, 1500=0.74, 2500=0.72, 5000=0.695 (USD)", Stock 1=1272, Supplier 1="Future Electronics"
J25: "CONN D-SUB RCPT 9POS R/A SOLDER", Color=Black, Current Rating=3A, Flammability Rating="UL94 V-0", Manufacturer=Assmann, Max Operating Temperature=105°C, Min Operating Temperature=-55°C, Supplier Part Number 1=AE10924-ND, Voltage Rating=250V, Category="D-Sub Connectors", ComponentLink1Description=http://www.assmann-wsw.com/fileadmin/datasheets/ASS_4888_CO.pdf?src-supplier=Digi-Key, ComponentLink1URL=http://www.assmann-wsw.com/fileadmin/datasheets/ASS_4888_CO.pdf?src-supplier=Digi-Key, Connector Type=D-Sub,Receptacle,Signal, Contact Material="Copper Alloy", Contact Plating=Gold, Housing Material=PBT, Lead Free="Lead Free", Manufacturer Part Number="A-DF 09 A/KG-T4S", Mount="Through Hole", Number of Pins=9, Number of Positions=9, Number of Rows=2, Packaging=Tray, Pricing 1="1=0.79000, 10=0.74200, 25=0.66800, 50=0.59380, 100=0.56910, 250=0.51964, 500=0.49490, 1000=0.40829, 2500=0.37118 (USD)", RoHS=Yes, Stock 1=19005, Supplier 1=Digi-Key, Termination=Solder
L5: library part LQH32PN1R0NNCL, "FIXED IND 1UH 2.5A 43.2 MOHM SMD", Case Code (Imperial)=1210, Case Code (Metric)=3225, Current Rating=2.5A, DC Resistance (DCR)=43.2mR, Inductance Tolerance=30%, Manufacturer=Murata, Max DC Current=1.75A, Max Operating Temperature=85°C, Min Operating Temperature=-40°C, Package Quantity=2000, Resistor Type=Wirewound, Saturation Current=3A, Self Resonant Frequency=100MHz, Supplier Part Number 1=81-LQH32PN1R0NNCL, Test Frequency=1MHz, Case/Package=1210, Category="Fixed Inductors", ComponentLink1Description=https://datasheet.ciiva.com/8002/1668059-8002720.pdf?src-supplier=Element14, ComponentLink1URL=https://datasheet.ciiva.com/8002/1668059-8002720.pdf?src-supplier=Element14, ComponentLink2Description=https://datasheet.ciiva.com/29691/o05e-29691893.pdf?src-supplier=Digi-Key, ComponentLink2URL=https://datasheet.ciiva.com/29691/o05e-29691893.pdf?src-supplier=Digi-Key, Core Material=Ferrite, Height=2mm, Height - Seated (Max)=0.086inch, Inductance=1uH, Lead Free="Lead Free", Length=0.126inch, Manufacturer Part Number=LQH32PN1R0NNCL, Mount="Surface Mount", Packaging="Tape and Reel", Pricing 1="1=0.48000, 10=0.33500, 50=0.33500, 100=0.28700, 1000=0.20100, 10000=0.19400 (USD)", REACH SVHC="No SVHC", RoHS=Yes, RoHS Compliant=Yes, Series=LQH32PN_NC, Shielding=Shielded, Stock 1=228, Supplier 1=Mouser, Termination=SMD/SMT, Tolerance=30%, Weight=0.000564oz, Width=2.5mm
L6: library part 74437324022, "FIXED IND 2.2UH 3.25A 61 MOHM", Case/Package=Nonstandard, Current Rating=3.25A, DC Resistance (DCR)=61mR, Frequency=49MHz, Inductance Tolerance=20%, Manufacturer="Wurth Electronics", Max Operating Temperature=125°C, Min Operating Temperature=-40°C, Package Quantity=3000, Resistor Type=Wirewound, Saturation Current=6.5A, Supplier Part Number 1=732-3331-1-ND, Test Frequency=100kHz, Category="Fixed Inductors", ComponentLink1Description=https://datasheet.ciiva.com/1052/74437324022-1052161.pdf?src-supplier=Digi-Key, ComponentLink1URL=https://datasheet.ciiva.com/1052/74437324022-1052161.pdf?src-supplier=Digi-Key, ComponentLink2Description=https://datasheet.ciiva.com/4961/74437324022-83042-4961251.pdf?src-supplier=Mouser, ComponentLink2URL=https://datasheet.ciiva.com/4961/74437324022-83042-4961251.pdf?src-supplier=Mouser, ComponentLink3Description=https://datasheet.ciiva.com/7892/1735824-7892719.pdf?src-supplier=Element14, ComponentLink3URL=https://datasheet.ciiva.com/7892/1735824-7892719.pdf?src-supplier=Element14, ComponentLink4Description=https://datasheet.ciiva.com/25608/0900766b810c01e6-25608143.pdf?src-supplier=RSComponents, ComponentLink4URL=https://datasheet.ciiva.com/25608/0900766b810c01e6-25608143.pdf?src-supplier=RSComponents, ComponentLink5Description=https://datasheet.ciiva.com/1052/74437324022-1052162.pdf?src-supplier=Digi-Key, ComponentLink5URL=https://datasheet.ciiva.com/1052/74437324022-1052162.pdf?src-supplier=Digi-Key, ComponentLink6Description=https://datasheet.ciiva.com/1052/74437324022-1052163.pdf?src-supplier=Digi-Key, ComponentLink6URL=https://datasheet.ciiva.com/1052/74437324022-1052163.pdf?src-supplier=Digi-Key, ComponentLink7Description=https://datasheet.ciiva.com/48691/001087560-da-01-ml-we-lhmi-smd-speicherdrossel-744373-de-en-48691628.pdf?src-supplier=Conrad, ComponentLink7URL=https://datasheet.ciiva.com/48691/001087560-da-01-ml-we-lhmi-smd-speicherdrossel-744373-de-en-48691628.pdf?src-supplier=Conrad, Core Material=Ferrite,Composite, Depth=4.06mm, Height=1.8mm, Height - Seated (Max)=0.079inch, Inductance=2.2uH, Length=4.45mm, Manufacturer Part Number=74437324022, Max DC Current=3.25A, Mount="Surface Mount", Packaging="Tape and Reel", Pricing 1="1=2.20000, 10=2.15000, 50=1.97100, 100=1.88200, 500=1.79200, 1000=1.70201 (USD)", REACH SVHC=Unknown, RMS Current (Irms)=3.25A, RoHS=Yes, RoHS Compliant=Yes, Self Resonant Frequency=49MHz, Series=WE-LHMI, Series Resistance=61mR, Shielding=Shielded, Stock 1=5747, Supplier 1=Digi-Key, Termination=SMD/SMT, Tolerance=20%, Width=4.06mm
LED1 LED2 LED3 LED4 LED5: library part APHHS1005QBC/D, "LED BLUE CLEAR CHIP SMD 0402", Case Code (Imperial)=0402, Case Code (Metric)=1005, Colour=Blue, Forward Current=20mA, Forward Voltage=3.3V, Lens Colour=Colorless, Manufacturer=Kingbright, Max Operating Temperature=85°C, Min Operating Temperature=-40°C, Package Quantity=2000, Power Rating=120mW, Supplier Part Number 1=754-1504-1-ND, Case/Package=0402, ComponentLink1Description=http://www.mouser.com/ds/2/216/APHHS1005QBC-D-54846.pdf, ComponentLink1URL=http://www.mouser.com/ds/2/216/APHHS1005QBC-D-54846.pdf, ComponentLink2Description=http://www.kingbrightusa.com/images/catalog/SPEC/APHHS1005QBC-D.pdf, ComponentLink2URL=http://www.kingbrightusa.com/images/catalog/SPEC/APHHS1005QBC-D.pdf, Dominant Wavelength=465nm, Height=0.6mm, Illumination Colour=Blue, Lead Free="Lead Free", Length=1mm, Lens Style=Clear, Lens Transparency=Clear, Luminous Intensity=60mcd, Manufacturer Part Number=APHHS1005QBC/D, Mount="Surface Mount", Packaging="Tape and Reel", Pricing 1="1=0.58, 10=0.42, 25=0.3432, 100=0.2746, 250=0.23168, 500=0.19734, 1000=0.15444 (USD)", Stock 1=57149, Supplier 1=Digi-Key, Test Current=20mA, Viewing Angle=120°, Width=0.5mm
MK1: "MIC COND ANALOG OMNI -38DB 6MM D", Manufacturer="Projects Unlimited", Max Supply Voltage=2V, Max Supply Voltage (DC)=10V, Operating Supply Current=500uA, Package Quantity=100, Supplier Part Number 1=668-1158-ND, Category=Microphones, ComponentLink1Description=https://datasheet.ciiva.com/2/pom-2738p-r-2038.pdf?src-supplier=Digi-Key, ComponentLink1URL=https://datasheet.ciiva.com/2/pom-2738p-r-2038.pdf?src-supplier=Digi-Key, ComponentLink2Description=https://datasheet.ciiva.com/4624/pom-2738p-r-42784-4624424.pdf?src-supplier=Mouser, ComponentLink2URL=https://datasheet.ciiva.com/4624/pom-2738p-r-42784-4624424.pdf?src-supplier=Mouser, ComponentLink3Description=https://datasheet.ciiva.com/6765/40103-6765772.pdf?src-supplier=Newark, ComponentLink3URL=https://datasheet.ciiva.com/6765/40103-6765772.pdf?src-supplier=Newark, ComponentLink4Description=https://datasheet.ciiva.com/1324/40103-1324045.pdf?src-supplier=Element14, ComponentLink4URL=https://datasheet.ciiva.com/1324/40103-1324045.pdf?src-supplier=Element14, Depth=2.7mm, Diameter=6mm, Direction=Omnidirectional, Height=2.9mm, Impedance=2.2kR, Lead Free="Lead Free", Length=6mm, Manufacturer Part Number=POM-2738P-R, Mount=PCB, Nominal Supply Voltage (DC)=2V, Output Type=Analog, Packaging=Bulk, Pricing 1="1=2.06000, 10=1.71100, 25=1.58120, 50=1.48720, 100=1.39620, 500=1.19848, 1000=1.17040 (USD)", REACH SVHC="No SVHC", RoHS=Yes, Shape=Circular,Round, Stock 1=1715, Supplier 1=Digi-Key, Termination="PC Pins", Voltage Rating=10V, Width=6mm
P1 P2 P3 P4: library part "TEST POINT", "Test Point ON"
Q1 Q2 Q4 Q5 Q7: "TRANS NPN 40V 200MA SOT23-3", Case/Package=SOT-23, Collector Base Voltage (VCBO)=60V, Collector Emitter Breakdown Voltage=40V, Collector Emitter Saturation Voltage=300mV, Current Rating=200mA, Emitter Base Voltage (VEBO)=6V, Frequency=300MHz, Manufacturer="ON Semiconductor / Fairchild", Max Operating Temperature=150°C, Max Power Dissipation=350mW, Min Operating Temperature=-55°C, Package Quantity=1, Category=BJTs, Collector Emitter Voltage (VCEO)=40V, ComponentLink1Description=https://datasheet.ciiva.com/971/mmbt3904-971892.pdf?src-supplier=Digi-Key, ComponentLink1URL=https://datasheet.ciiva.com/971/mmbt3904-971892.pdf?src-supplier=Digi-Key, ComponentLink2Description=https://datasheet.ciiva.com/971/mmbt3904-971893.pdf?src-supplier=Digi-Key, ComponentLink2URL=https://datasheet.ciiva.com/971/mmbt3904-971893.pdf?src-supplier=Digi-Key, ComponentLink3Description=https://datasheet.ciiva.com/22653/1922793-22653482.pdf?src-supplier=Element14, ComponentLink3URL=https://datasheet.ciiva.com/22653/1922793-22653482.pdf?src-supplier=Element14, ComponentLink4Description=https://datasheet.ciiva.com/971/mmbt3904-971891.pdf?src-supplier=Digi-Key, ComponentLink4URL=https://datasheet.ciiva.com/971/mmbt3904-971891.pdf?src-supplier=Digi-Key, ComponentLink5Description=https://datasheet.ciiva.com/26237/mmbt3904-26237242.pdf?src-supplier=Avnet+Europe, ComponentLink5URL=https://datasheet.ciiva.com/26237/mmbt3904-26237242.pdf?src-supplier=Avnet+Europe, ComponentLink6Description=https://datasheet.ciiva.com/7972/2n3904-7972669.pdf?src-supplier=Element14, ComponentLink6URL=https://datasheet.ciiva.com/7972/2n3904-7972669.pdf?src-supplier=Element14, ComponentLink7Description=https://datasheet.ciiva.com/16850/mmbt3904-16850397.pdf?src-supplier=Future+Electronics, ComponentLink7URL=https://datasheet.ciiva.com/16850/mmbt3904-16850397.pdf?src-supplier=Future+Electronics, ComponentLink8Description=https://datasheet.ciiva.com/11201/mmbt3904-11201775.pdf?src-supplier=Avnet, ComponentLink8URL=https://datasheet.ciiva.com/11201/mmbt3904-11201775.pdf?src-supplier=Avnet, Contact Plating=Tin,Matte, Element Configuration=Single, Gain Bandwidth Product=300MHz, Height=0.25inch, hFE Min=100, Lead Free="Lead Free", Length=0.25inch, Manufacturer Part Number=MMBT3904, Max Breakdown Voltage=40V, Max Collector Current=200mA, Max Frequency=300MHz, Mount="Surface Mount", Number of Elements=1, Number of Pins=3, Packaging="Tape and Reel", Polarity=NPN, Power Dissipation=350mW, Pricing 1="1=0.56240, 10=0.13670, 50=0.12330, 100=0.10020 (USD)", Radiation Hardening=No, REACH SVHC="No SVHC", RoHS=Yes, RoHS Compliant=Yes, Stock 1=1, Supplier 1="Arrow Electronics", Supplier Part Number 1=MMBT3904, Termination=SMD/SMT, Transition Frequency=300MHz, Voltage Rating (DC)=40V, Weight=0.03g, Width=0.25inch
Q3 Q6: "P-Channel -12V 4.1A 900mV @ 250uA 45mΩ @ 3.5A,4.5V 350mW SOT-23(SOT-23-3) MOSFET RoHS", Manufacturer="Changjiang Electronics Tech (CJ)", Package=SOT-23, Manufacturer Part No=CJ2305